# Altium PCB iR-Blaster.PcbDoc
Units mil, origin at the board's own origin, x right, y up, seen from the top; angles counter-clockwise.
Board outline 1958.66 x 1633.86 mil, 4 copper layers (Top Layer, GND, Power, Bottom Layer), stack 61.811 mil thick; 49 components, 31 nets, 174 pads, 59 vias.
Unrouted connection lines stored in the file: 2.
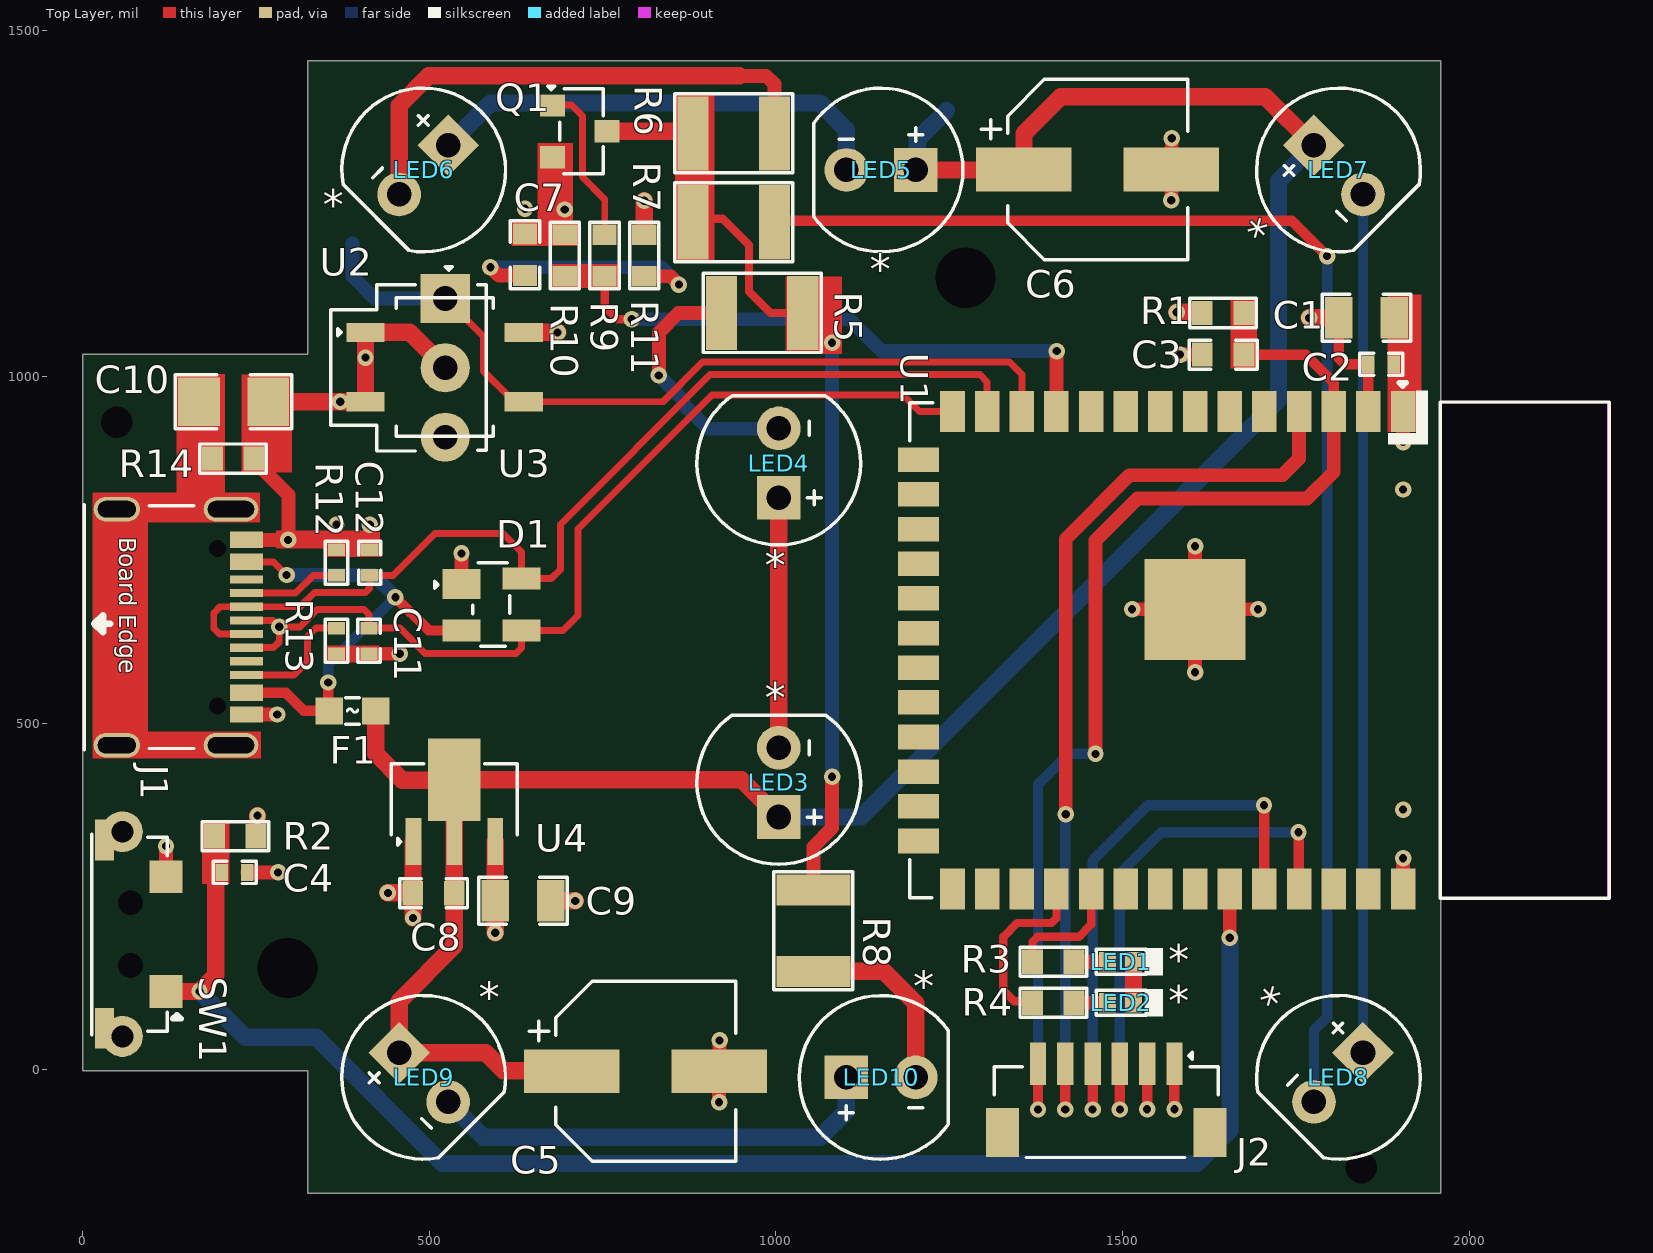
[diagram p0: Top Layer view]
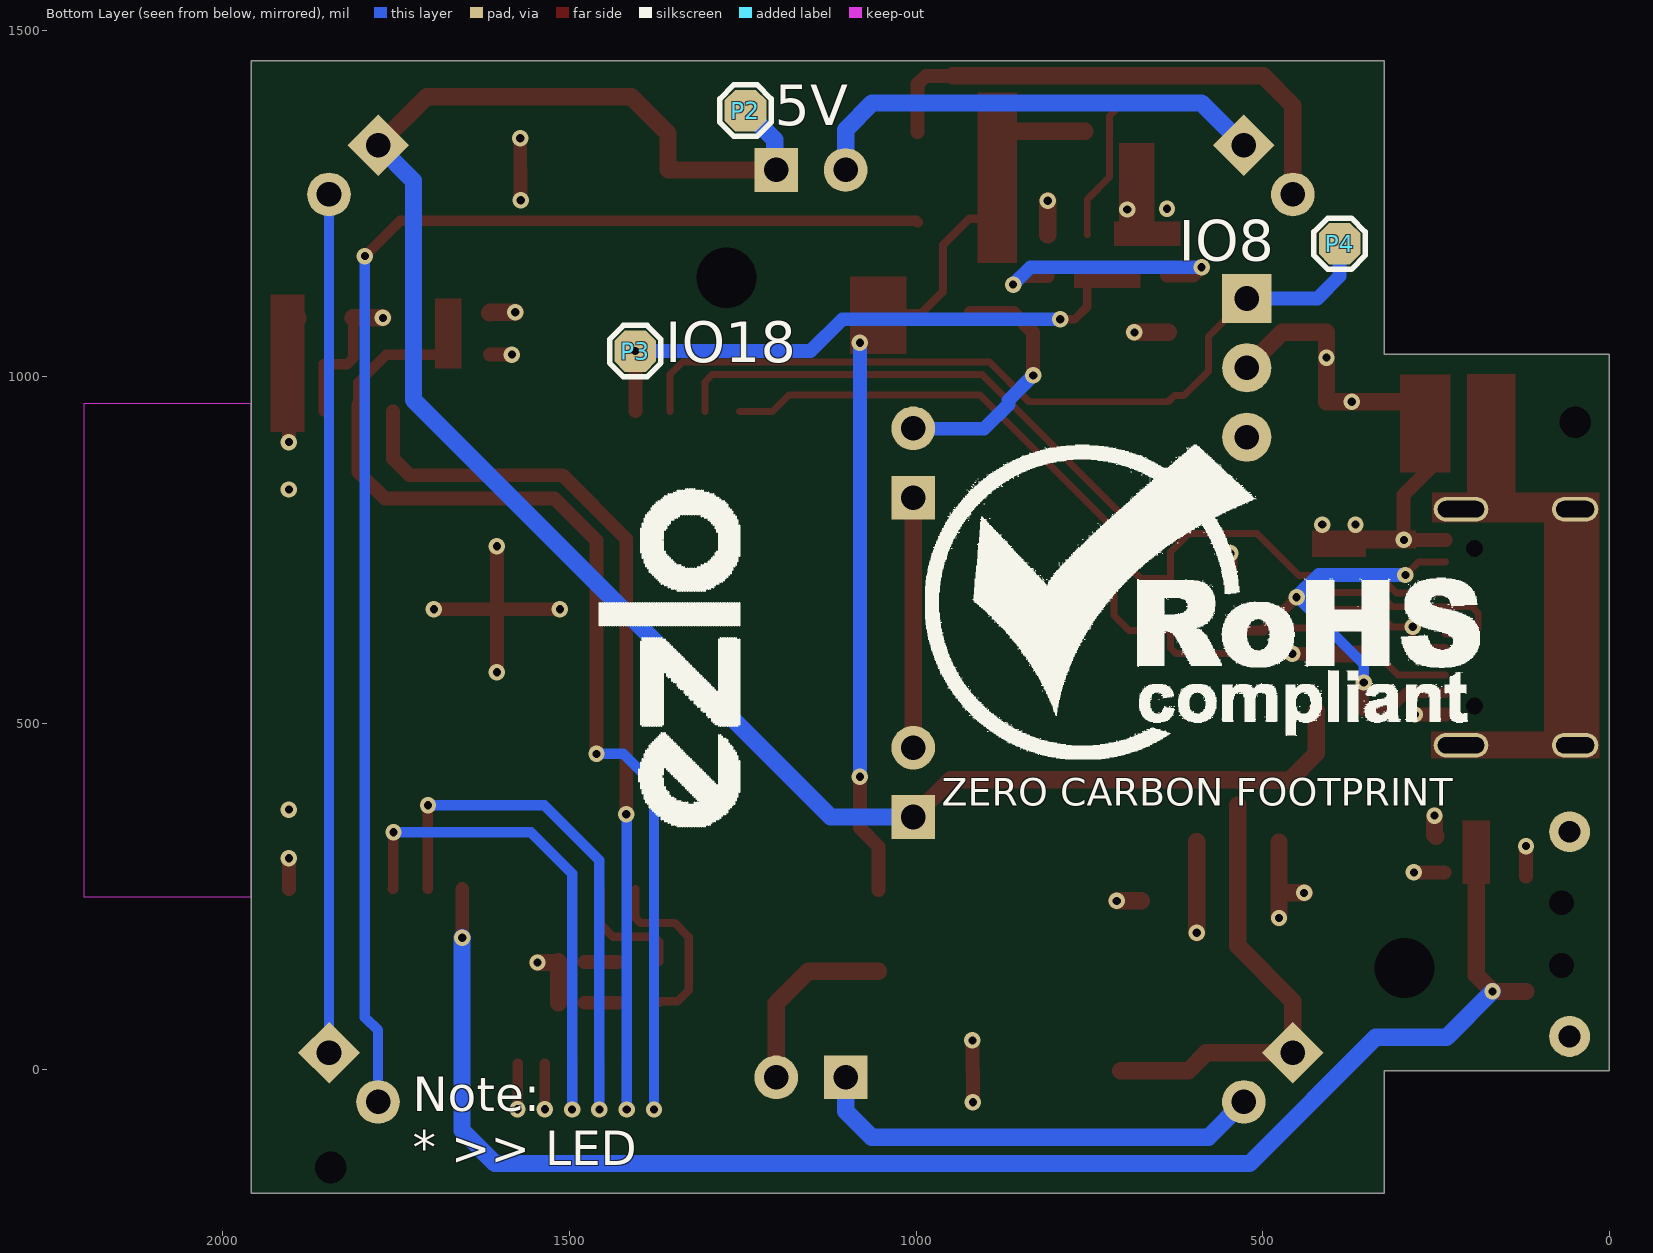
[diagram p1: Bottom Layer view, seen from below]
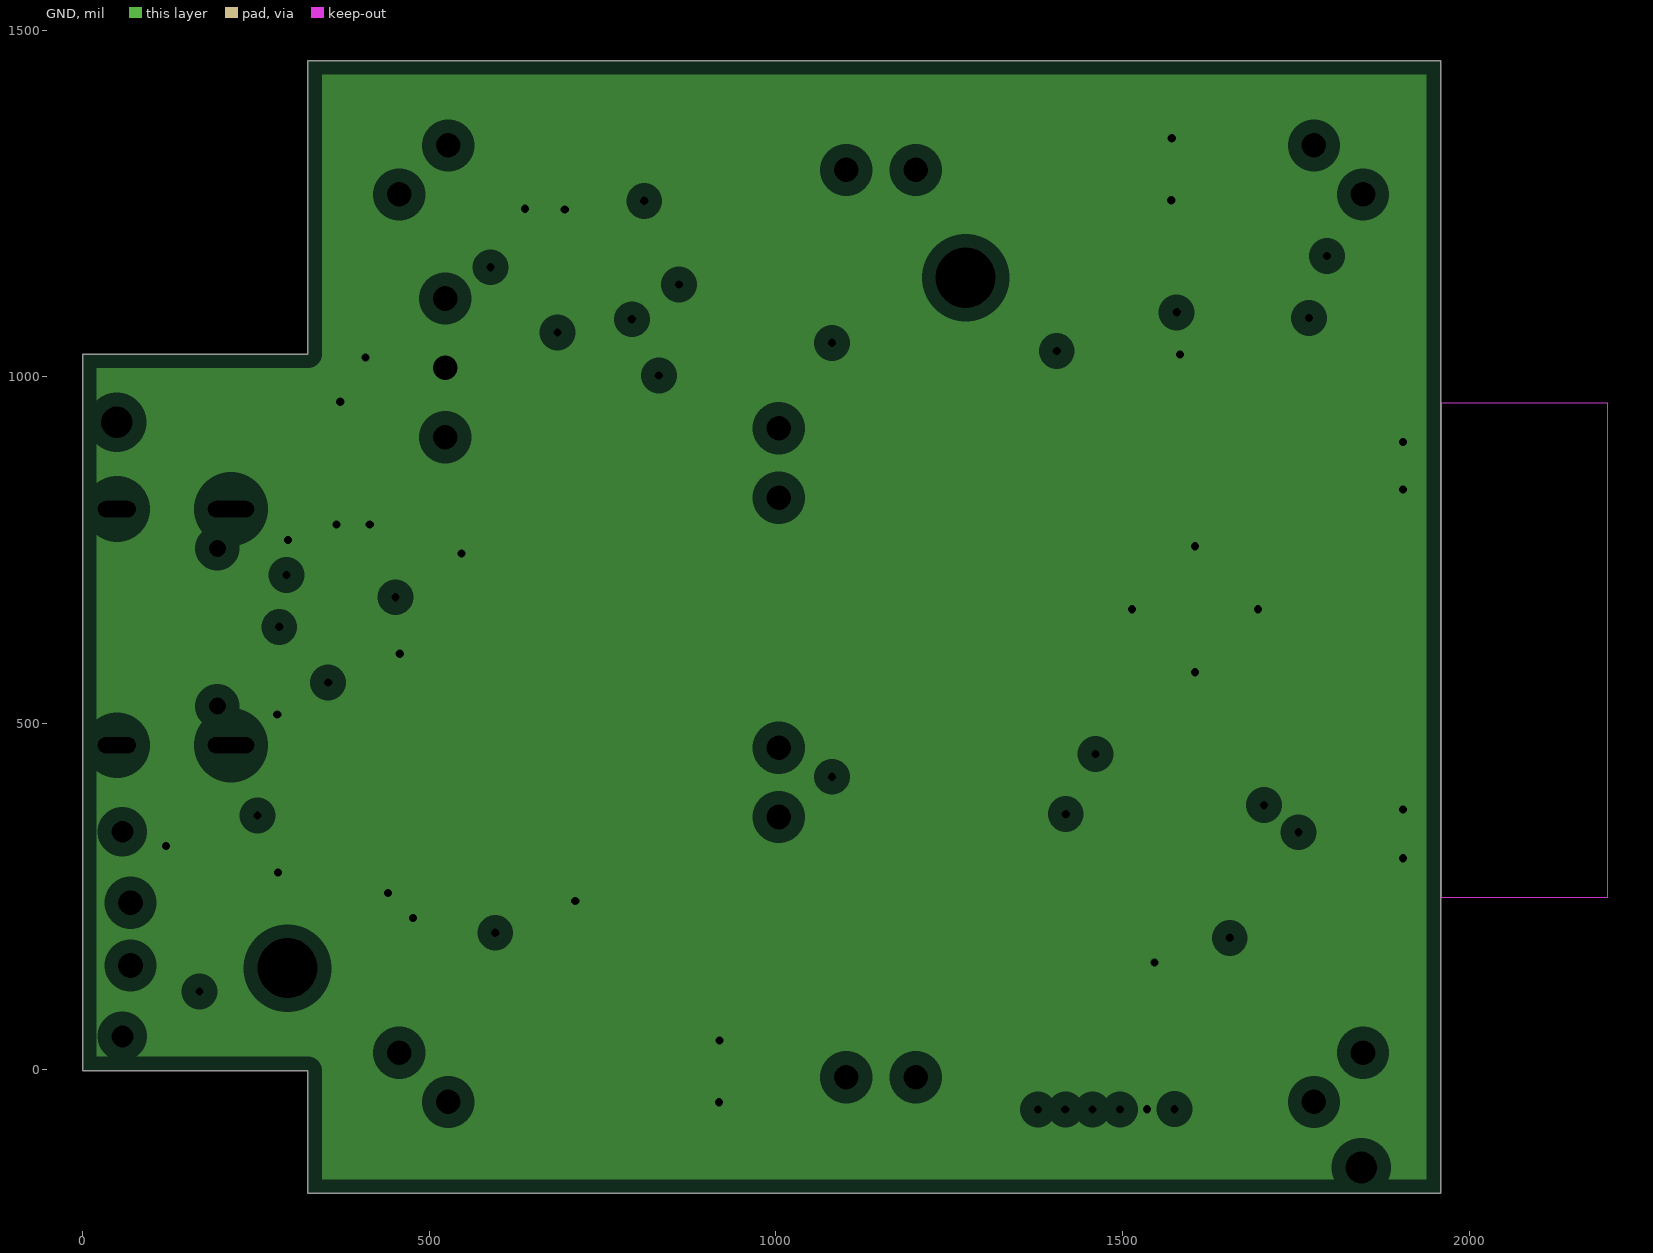
[diagram p2: GND, clearances drawn from the general rule]
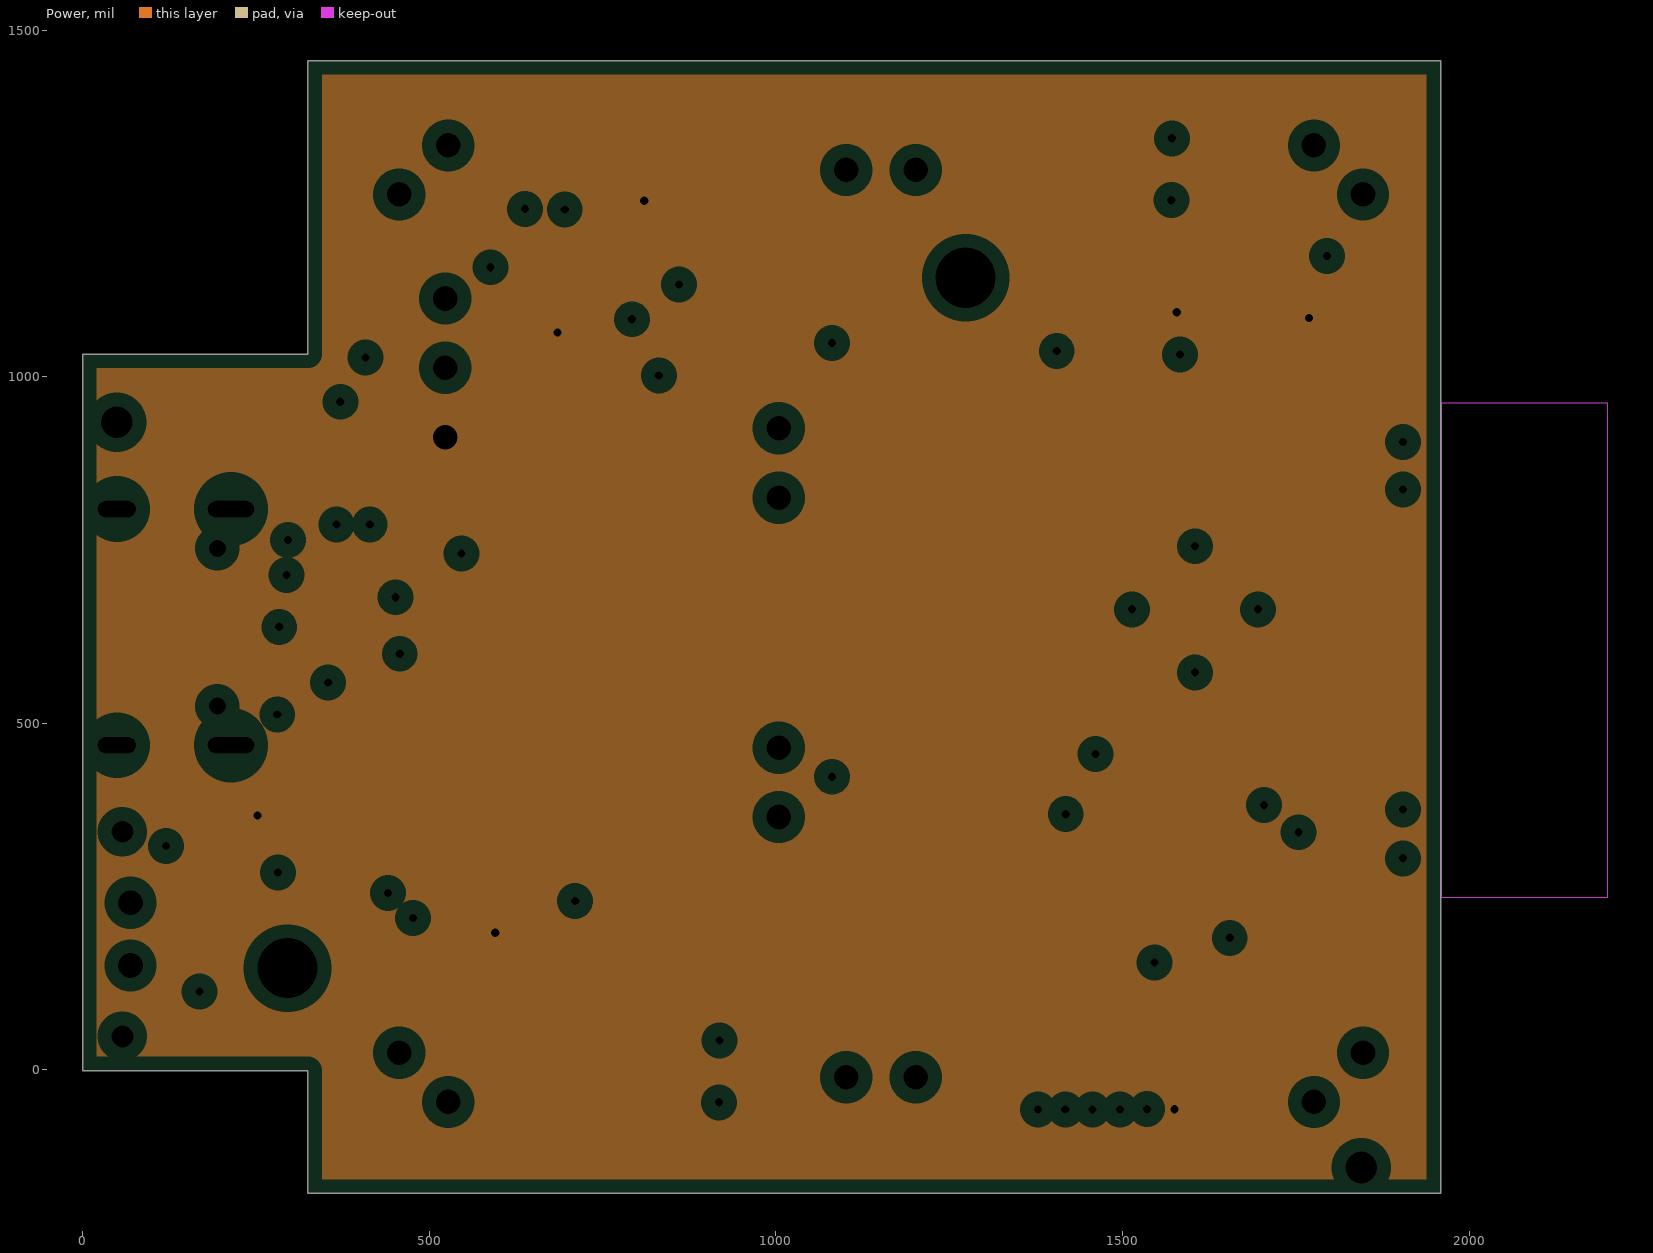
[diagram p3: Power, clearances drawn from the general rule]
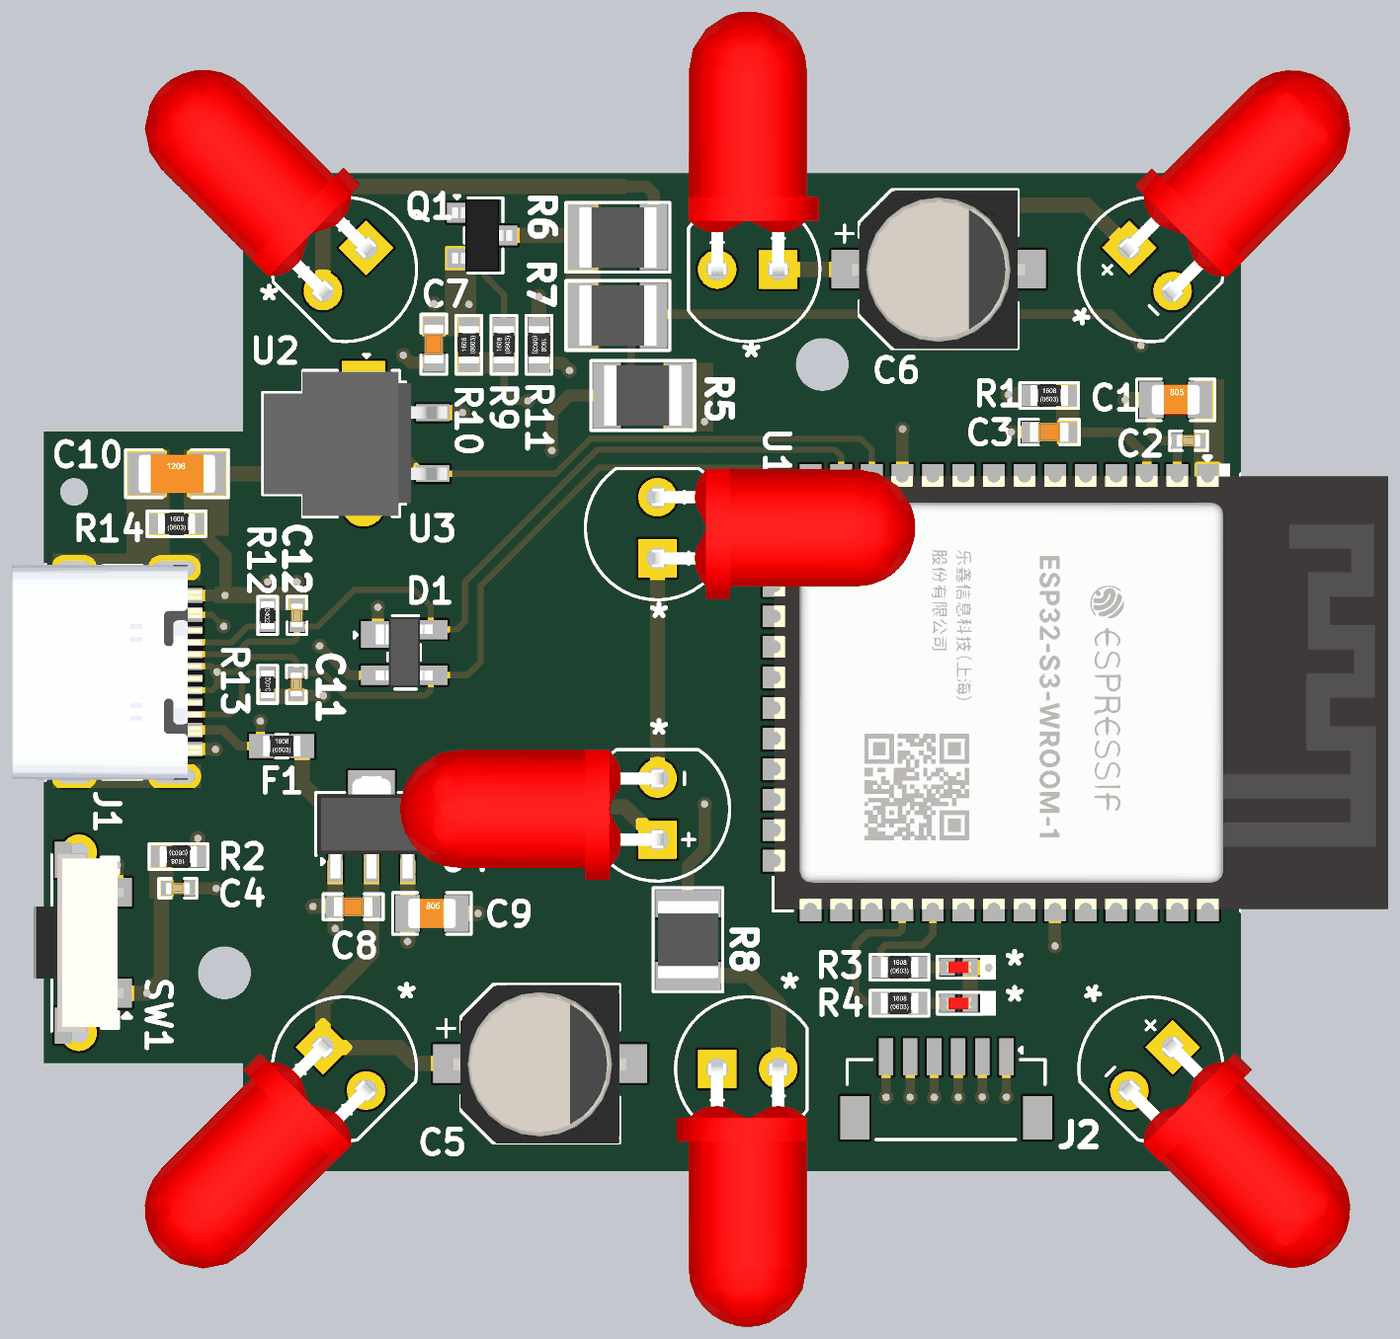
[diagram p4: 3D render of the assembled board from above, using the file's embedded part models]

## Layer stack, top to bottom
Top Solder: solder mask 0.4, Solder Resist, Dk 3.5
Top Layer: signal copper 1.378
Dielectric 2: prepreg 7.874, PP-006, Dk 4.1
GND: plane copper 1.378, net GND
Dielectric 1: core 40.5512, FR-4, Dk 4.8
Power: plane copper 1.378, net 3V3
Dielectric 3: prepreg 7.874, PP-006, Dk 4.1
Bottom Layer: signal copper 1.378
Bottom Solder: solder mask 0.4, Solder Resist, Dk 3.5

## Board outline
0,-0.83 324.8,-0.83 324.8,-178 1958.66,-178 1958.66,1455.86 324.8,1455.86 324.8,1032.63 0,1032.63

## Design rules (kind name [scope] priority, off if disabled: settings)
Clearance [All] p1: gap=6 ignorepadtopadclearanceinfootprint=FALSE
ComponentClearance [All] p1: gap=0 collisioncheckmode=3 verticalgap=0 showdistances=FALSE
HoleSize [All] p1: absolutevalues=TRUE maxlimit=1000 minlimit=1 maxpercent=80.000 minpercent=20.000
HoleToHoleClearance [All] p1: gap=0 allowstackedmicrovias=TRUE
MinimumSolderMaskSliver [All] p1: minsoldermaskwidth=0
PlaneClearance [All] p1: clearance=20
PlaneConnect [All] p1: planeconnectstyle=Relief reliefexpansion=20 reliefentries=4 reliefconductorwidth=10 reliefairgap=10
PolygonConnect [All] p1: connectstyle=Relief reliefconductorwidth=10 reliefentries=4 polygonreliefangle="90 Angle" airgapwidth=10
RoutingVias [All] p1: holewidth=11.81 width=23.62 viastyle="Through Hole" minholewidth=11.81 minwidth=23.62 maxholewidth=31.5 maxwidth=62.99
SilkToSilkClearance [All] p1: silktosilkclearance=0
SilkToSolderMaskClearance [IsPad] p1: minsilkscreentomaskgap=0 clearancetoexposedcopper=TRUE
SolderMaskExpansion [All] p1: expansion=4 istentingtop=FALSE
Width [All] p1: maxlimit=25 minlimit=10 preferedwidth=15
22 further rules are at their usual default settings.

## Classes and differential pairs
component class "USB & LDO_Section": C8 C9 C10 C11 C12 D1 F1 J1 R12 R13 R14 U4
component class iR_Receiver_Section: C7 P4 R11 U2 U3
component class iR-Blaster_Section: C5 C6 LED3 LED4 LED5 LED6 LED7 LED8 LED9 LED10 P2 P3 Q1 R5 R6 R7 R8 R9 R10
component class Controller_Section: C1 C2 C3 C4 J2 LED1 LED2 R1 R2 R3 R4 SW1 U1

## Components (designator, comment, footprint, x,y, rotation, side; value= is the part's Value field where it differs from the comment)
C1 "22uF" Cap-0805 1852,1085 r0 top
C2 "0.1uF" Cap-0402 1873,1018 r0 top
C3 "1uF" Cap-0603 1645,1032 r0 top
C4 "0.1uF" Cap-0402 219,285 r180 top
C5 "220uF" RT1A221M0605 812,-2 r0 top locked
C6 "220uF" RT1A221M0605 1464,1299 r0 top locked
C7 "4.7UF" Cap-0603 638,1176 r270 top
C8 "10uF" Cap-0603 506,255 r180 top
C9 "22uF" Cap-0805 635,244 r0 top
C10 "4.7nF" Cap-1206 217.66,963.86 r0 top
C11 "TBD" Cap-0402 413,619 r270 top
C12 "TBD" Cap-0402 414,732 r90 top
D1 "SP0503BAHTG" SOT-143-4_ 546.39,700.93 r0 top
F1 "BSMD0603L-100" fuse-0603 389,518 r0 top
J1 "TYPE-C-31-M-12" TYPE-C-31-M-12_ 236.22,764.72 r270 top locked
J2 "Voltlink Target" "Voltlink Target" 1476.38,-40.7 r180 top locked
LED1 "Green" LED-0402 1497,156 r0 top
LED2 "Red" LED-0402 1497,97 r0 top
LED3 "IR333-A" "IR333-A Cut" 1004,414.91 r270 top locked
LED4 "IR333-A" IR333_A 1004,875.54 r90 top locked
LED5 "IR333-A" IR333_A 1151.57,1298.38 r180 top locked
LED6 "IR333-A" IR333_A 491.73,1298.38 r225 top locked
LED7 "IR333-A" "IR333-A CUT" 1811.42,1298.38 r135 top
LED8 "IR333-A" "IR333-A CUT" 1811.42,-10.68 r45 top locked
LED9 "IR333-A" IR333_A 491.73,-10.68 r315 top locked
LED10 "IR333-A" IR333_A 1151.57,-10.68 r0 top locked
P2 "TEST POINT" Test-point 1246,1384 r180 bottom
P3 "TEST POINT" Test-point 1405,1037 r180 bottom
P4 "TEST POINT" Test-point 389,1192 r180 bottom
Q1 "YJL2302B" SOT-23-3L_ 717,1354 r270 top
R1 "10K" RES-0603 1645,1092 r180 top
R2 "10K" RES-0603 220,337 r0 top
R3 "330R" Res-0603 1400,156 r180 top
R4 "330R" Res-0603 1400,97 r180 top
R5 "27R" Res_1210 980,1092 r180 top
R6 "27R" Res_1210 939,1351 r0 top
R7 "27R" Res_1210 939,1223 r0 top
R8 "27R" Res_1210 1054,201 r270 top
R9 "100R" Res-0603 752.67,1175 r270 top
R10 "10K" RES-0603 695.33,1175 r270 top
R11 "100R" Res-0603 810,1175 r90 top
R12 "5.1K" Res-0402 366,732 r270 top
R13 "5.1K" Res-0402 366,619 r90 top
R14 "1M" Res-0603 217,882 r180 top
SW1 "YTS-B003-2A" YTS-B003-2A 75.79,196.02 r90 top locked
U1 "ESP32-S3-WROOM-1-N4" "41-SMD Module" 1555,605.51 r270 top locked
U2 "IRM-H638T/TR2" SMD-4,4x5mm 522,1014 r0 top locked
U3 "IRM-3638T" SIP-3P-2.54mm 522.83,1012.94 r270 top locked
U4 "LR1107G-33-AB3-C-R" SOT-89-3 536,374 r0 top

## Footprints (in the part's own frame and the unit in brackets; to place one, negate y for a bottom-side part, rotate by r counter-clockwise, add the part's x,y. Pads: shape width x height; smd on the part's side, far side on the other; paste and mask are expansions set on the pad)
"41-SMD Module" [mm]
  rect 1.5x0.9 smd: 1(-8.75,8.88) 2(-8.75,7.61) 3(-8.75,6.34) 4(-8.75,5.07) 5(-8.75,3.8) 6(-8.75,2.53) 7(-8.75,1.26) 8(-8.75,-0.01) 9(-8.75,-1.28) 10(-8.75,-2.55) 11(-8.75,-3.82) 12(-8.75,-5.09) 13(-8.75,-6.36) 14(-8.75,-7.63) 27(8.75,-7.63) 28(8.75,-6.36) 29(8.75,-5.09) 30(8.75,-3.82) 31(8.75,-2.55) 32(8.75,-1.28) 33(8.75,-0.01) 34(8.75,1.26) 35(8.75,2.53) 36(8.75,3.8) 37(8.75,5.07) 38(8.75,6.34) 39(8.75,7.61) 40(8.75,8.88)
  rect 0.9x1.5 smd: 15(-6.98,-8.88) 16(-5.71,-8.88) 17(-4.44,-8.88) 18(-3.17,-8.88) 19(-1.9,-8.88) 20(-0.63,-8.88) 21(0.64,-8.88) 22(1.91,-8.88) 23(3.18,-8.88) 24(4.45,-8.88) 25(5.72,-8.88) 26(6.99,-8.88)
  rect 3.7x3.7 smd: 41(-1.5,1.26)
  Keep-Out Layer region: -9.042,10.285 9.042,10.285 9.042,16.381 -9.042,16.381
  silkscreen extent -9.8,-9.2 9.09,16.43, body extent -9.01,-9.14 9.01,16.37, height 3.16
Cap-0402 [mil]
  rect 18x25 smd mask+2.36: 1(-18.5,0) 2(18.5,0)
  silkscreen extent -31,-16 31,16, body extent -20,-10 20,10, height 19
Cap-0603 [mil]
  rect 30x35 smd mask+2.36: 1(-30,0) 2(30,0)
  silkscreen extent -49,-21 49,21, body extent -32,-16 31,16, height 34
Cap-0805 [mil] "SMD 0805"
  rect 40x60 smd mask+2.76: 1(-40,0) 2(40,0)
  silkscreen extent -64,-34 64,34, body extent -39,-25 39,25, height 30
Cap-1206 [mil] "SMD 1206"
  rect 60x70 smd: 1(-50,0) 2(50,0)
  silkscreen extent -84,-39 84,39, body extent -63,-31 63,32, height 39
fuse-0603 [mm]
  rect 1x1 smd: 1(-0.85,0) 2(0.85,0)
  silkscreen extent -0.25,-0.48 0.25,0.48, body extent -0.77,-0.42 0.78,0.43, height 0.45
"IR333-A Cut" [mm]
  rect 1.6x1.6 hole 0.9: 1(1.27,0)
  round 1.6 hole 0.9: 2(-1.27,0)
  silkscreen extent -2.47,-3 3,3, body extent -2.45,-10.7 2.95,0.25, height 7.95
"IR333-A CUT" [mm]
  rect 1.6x1.6 hole 0.9: 1(1.27,0)
  round 1.6 hole 0.9: 2(-1.27,0)
  silkscreen extent -2.47,-3 3,3, body extent -2.45,-10.7 2.95,0.25, height 7.95
IR333_A [mm]
  rect 1.6x1.6 hole 0.9: 1(-1.27,0)
  round 1.6 hole 0.9: 2(1.27,0)
  silkscreen extent -3,-3 2.47,3, body extent -2.95,-10.72 2.45,0.23, height 7.95
LED-0402 [mm]
  rect 0.62x0.72 smd: 1(-0.475,0) 2(0.475,0)
  silkscreen extent -0.89,-0.51 1.55,0.51, body extent -0.5,-0.25 0.51,0.25, height 0.45
Res-0402 [mil]
  rect 18x25 smd mask+2.17: 1(-18.5,0) 2(18.5,0)
  silkscreen extent -32,-17 32,16, body extent -23,-11 23,11, height 16
RES-0603 [mil]
  rect 30x35 smd: 1(-30,0) 2(30,0)
  silkscreen extent -48,-21 48,21, body extent -31,-17 31,17, height 18
Res-0603 [mil]
  rect 30x35 smd: 1(-30,0) 2(30,0)
  silkscreen extent -48,-21 48,21, body extent -31,-17 31,17, height 18
Res_1210 [mm]
  rect 1.14x2.72 smd: 1(-1.49,0) 2(1.49,0)
  silkscreen extent -2.16,-1.45 2.16,1.45, body extent -1.6,-1.25 1.6,1.25, height 0.7
RT1A221M0605 [mm]
  rect 3.5x1.6 smd: 1(-2.7,0) 2(2.7,0)
  silkscreen extent -4.27,-3.3 3.3,3.3, body extent -3.61,-3.33 3.59,3.27, height 5.4
SIP-3P-2.54mm [mm]
  rect 1.8x1.8 hole 0.9: 1(-2.54,0)
  round 1.8 hole 0.9: 2(0,0) 3(2.54,0)
  silkscreen extent -3.71,-4.19 3.05,1.5, body extent -3,-4.14 3,1.46, height 8.35
SMD-4,4x5mm [mm]
  rect 1.4x0.7 smd: 1(-2.9,1.27) 2(-2.9,-1.27) 3(2.9,-1.27) 4(2.9,1.27)
  silkscreen extent -3.91,-2.54 1.78,2.54, body extent -3.5,-2.5 3.5,2.5, height 3.99
SOT-23-3L_ [mm]
  rect 0.82x0.92 smd: 1(-0.95,-1) 2(0.95,-1) 3(0,1)
  silkscreen extent -1.65,-1.17 1.56,0.86, body extent -1.5,-1.25 1.5,1.25, height 1.1
SOT-89-3 [mm]
  rect 0.58x1.73 smd: 1(-1.5,-1.132) 2(0,-1.132) 3(1.5,-1.132)
  rect 1.933x3.03 smd: 2(0,1.132)
  silkscreen extent -2.31,-1.27 2.31,1.73, body extent -2.25,-1.84 2.25,2.41, height 1.54
SOT-143-4_ [mm]
  rect 1.4x1.1 smd: 1(0,0)
  rect 1.4x0.8 smd: 2(0,-1.7) 3(2.2,-1.7) 4(2.2,0.2)
  silkscreen extent -0.99,-2.27 1.76,0.77, body extent -0.08,-2.21 2.29,0.71, height 1.22
Test-point [mil]
  oct 60x60 smd: 1(0,0)
  silkscreen extent -37,-37 37,37
TYPE-C-31-M-12_ [mm]
  rect 0.6x1.2 smd: A1/B12(0,0) A4/B9(0.8,0) B1/A12(6.4,0) B4/A9(5.6,0)
  rect 0.3x1.2 smd: A5(1.95,0) A6(2.95,0) A7(3.45,0) A8(4.45,0) B5(4.95,0) B6(3.95,0) B7(2.45,0) B8(1.45,0)
  round 0 hole 0.62 unplated: MH(0.31,-1.07) MH(6.09,-1.07)
  oval 0.9x2 hole 0.6 slot 1.7 at 90 deg: S1(7.525,-0.57) S4(-1.125,-0.57)
  oval 0.9x1.7 hole 0.6 slot 1.4 at 90 deg: S2(7.525,-4.75) S3(-1.125,-4.75)
  silkscreen extent -1.3,-5.94 7.7,-1.93, body extent -1.27,-7.32 7.67,0.58, height 3.31
"Voltlink Target" [mm]
  rect 0.6x1.55 smd: 1(-2.5,-1.262) 2(-1.5,-1.262) 3(-0.5,-1.262) 4(0.5,-1.262) 5(1.5,-1.262) 6(2.5,-1.262)
  rect 1.2x1.8 smd: MP1(-3.8,1.262) MP2(3.8,1.262)
  silkscreen extent -4.11,-1.68 4.11,2.17
YTS-B003-2A [mm]
  rect 1.2x1.2 smd: 1(-2.1,-1.125) 2(2.1,-1.125)
  rect 1.5x0.7 smd: 3(3.45,1.125) 4(-3.45,1.125)
  round 1.5 hole 0.8: 5(3.75,0.475) 6(-3.75,0.475)
  round 0 hole 0.9 unplated: MH0(-1.15,0.175) MH1(1.15,0.175)
  silkscreen extent -3.68,-1.68 3.66,1.6, body extent -3.7,-1.37 3.7,2.36, height 3.59

## Part data
C1 C9: library part CL21A226MAYNNNE, "CAP CER 22UF 25V X5R 0805", LCSC Part Number=C602037, Manufacturer=Samsung, Supplier Part Number 1=187-CL21A226MAYNNNE, Category="Ceramic Capacitors", Manufacturer Part Number=CL21A226MAYNNNE, Pricing 1="1=0.28000, 10=0.18500, 50=0.18500, 100=0.10600, 500=0.07500, 1000=0.06400, 2000=0.06100, 10000=0.05400, 24000=0.05100, 50000=0.04600 (USD)", RoHS=Yes, RoHS Compliant=Yes, Stock 1=1240410, Supplier 1=Mouser
C2 C4: library part C1005X5R1H104K050BB, "CAP CER 0.1UF 50V X5R 0402", Capacitance=100nF, Case Code (Imperial)=0402, Case Code (Metric)=1005, Dielectric=X5R, Dielectric Material=Ceramic, LCSC Part Number=C2181865, Manufacturer=TDK, Max Operating Temperature=85°C, Min Operating Temperature=-55°C, Package Quantity=1, Supplier Part Number 1=445-5942-1-ND, Tolerance=10%, Voltage=50V, Case/Package=0402, ComponentLink1Description=https://product.tdk.com/info/en/catalog/spec/mlccspec_commercial_general_midvoltage_en.pdf?src-supplier=Digi-Key, ComponentLink1URL=https://product.tdk.com/info/en/catalog/spec/mlccspec_commercial_general_midvoltage_en.pdf?src-supplier=Digi-Key, ComponentLink2Description=http://www.tdk.co.jp/tefe02/e413_c.pdf?src-supplier=Future+Electronics, ComponentLink2URL=http://www.tdk.co.jp/tefe02/e413_c.pdf?src-supplier=Future+Electronics, ComponentLink3Description=https://www.verical.com/server-webapp/html/getDatasheet?partID=743571&src-supplier=Verical, ComponentLink3URL=https://www.verical.com/server-webapp/html/getDatasheet?partID=743571&src-supplier=Verical, ComponentLink4Description=http://www.tdk.co.jp/tefe02/e412_c.pdf?src-supplier=Avnet+Europe, ComponentLink4URL=http://www.tdk.co.jp/tefe02/e412_c.pdf?src-supplier=Avnet+Europe, Construction=Flat, Depth=0.5mm, Height=0.5mm, Lead Free="Lead Free", Length=1mm, Manufacturer Part Number=C1005X5R1H104K050BB, Mount="Surface Mount", Packaging="Tape and Reel", Pricing 1="1=0.12, 10=0.09, 50=0.049, 100=0.04, 500=0.02858, 1000=0.02245, 2500=0.02041, 5000=0.01878 (USD)", Radiation Hardening=No, REACH SVHC="No SVHC", Resistor Type=Ceramic, RoHS Compliant=Yes, Series=C, Stock 1=1455182, Supplier 1=Digi-Key, Termination=SMD/SMT, Thickness=0.022inch, Voltage Rating=50V, Voltage Rating (DC)=50V, Weight=2.3E-05oz, Width=0.02inch
C3: library part CC0603KRX5R8BB105, "CAP CER 1UF 25V X5R 0603", Case Code (Imperial)=0603, Case Code (Metric)=1608, Dielectric=X5R, LCSC Part Number=C14664, Manufacturer=Yageo, Max Operating Temperature=85°C, Min Operating Temperature=-55°C, Package Quantity=1, Supplier Part Number 1=311-1445-1-ND, Tolerance=10%, Voltage Rating=25V, Capacitance=1uF, Case/Package=0603, Category="Ceramic Capacitors", ComponentLink1Description=https://datasheet.ciiva.com/176/mlccorderingcode-176785.pdf?src-supplier=Digi-Key, ComponentLink1URL=https://datasheet.ciiva.com/176/mlccorderingcode-176785.pdf?src-supplier=Digi-Key, ComponentLink2Description=https://datasheet.ciiva.com/176/mlccorderingcode-176786.pdf?src-supplier=Digi-Key, ComponentLink2URL=https://datasheet.ciiva.com/176/mlccorderingcode-176786.pdf?src-supplier=Digi-Key, ComponentLink3Description=https://datasheet.ciiva.com/176/mlccorderingcode-176787.pdf?src-supplier=Digi-Key, ComponentLink3URL=https://datasheet.ciiva.com/176/mlccorderingcode-176787.pdf?src-supplier=Digi-Key, ComponentLink4Description=https://datasheet.ciiva.com/17436/upy-gphc-x5r-4v-to-50v-12-17436952.pdf?src-supplier=Avnet+Europe, ComponentLink4URL=https://datasheet.ciiva.com/17436/upy-gphc-x5r-4v-to-50v-12-17436952.pdf?src-supplier=Avnet+Europe, ComponentLink5Description=https://datasheet.ciiva.com/7978/1525783-7978171.pdf?src-supplier=Element14, ComponentLink5URL=https://datasheet.ciiva.com/7978/1525783-7978171.pdf?src-supplier=Element14, ComponentLink6Description=https://datasheet.ciiva.com/11586/upy-gphc-x5r-4v-to-50v-12-11586318.pdf?src-supplier=Avnet, ComponentLink6URL=https://datasheet.ciiva.com/11586/upy-gphc-x5r-4v-to-50v-12-11586318.pdf?src-supplier=Avnet, Construction=Flat, Depth=0.8mm, Halogen Free="Halogen Free", Height=0.8mm, Lead Free="Lead Free", Length=1.6mm, Manufacturer Part Number=CC0603KRX5R8BB105, Mount="Surface Mount", Number of Pins=2, Packaging="Tape and Reel", Pricing 1="1=0.12000, 10=0.08400, 50=0.04760, 100=0.03940, 500=0.02764, 1000=0.02288 (USD)", Radiation Hardening=No, REACH SVHC="No SVHC", RoHS=Yes, RoHS Compliant=Yes, Series=CC, Stock 1=919939, Supplier 1=Digi-Key, Termination=SMD/SMT, Thickness=0.035inch, Voltage Rating (DC)=25V, Width=0.031inch
C5 C6: library part RT1A221M0605, "220uF 5.4mm 10V 6.3mm ±20% SMD,D6.3xL5.4mm Aluminum Electrolytic Capacitors - SMD ROHS", LCSC Part Number=C267466, Manufacturer=ROQANG, Package=SMD,D6.3xL5.4mm, ComponentLink1Description=LCSC, ComponentLink1URL=https://lcsc.com/product-detail/Aluminum-Electrolytic-Capacitors-SMD_ROQANG-RT1A221M0605_C267466.html, Item Type=Capacitor, Manufacturer Part Number=RT1A221M0605
C7: library part CL10A475KA8NQNC, "CAP CER 4.7UF 25V X5R 0603", Capacitance=4.7uF, Case Code (Imperial)=0603, Case Code (Metric)=1608, Dielectric=X5R, LCSC Part Number=C69335, Manufacturer=Samsung, Max Operating Temperature=85°C, Min Operating Temperature=-55°C, Package Quantity=1, Supplier Part Number 1=1276-1900-1-ND, Tolerance=10%, Voltage Rating=25V, Case/Package=0603, ComponentLink1Description=http://www.samsungsem.com/kr/support/product-search/mlcc/CL10A475KA8NQNC.jsp?src-supplier=Digi-Key, ComponentLink1URL=http://www.samsungsem.com/kr/support/product-search/mlcc/CL10A475KA8NQNC.jsp?src-supplier=Digi-Key, Contact Plating=Tin, Depth=0.8mm, Lead Free="Lead Free", Length=1.6mm, Manufacturer Part Number=CL10A475KA8NQNC, Mount="Surface Mount", Packaging="Tape and Reel", Pricing 1="1=0.37, 10=0.255, 100=0.1528, 500=0.11456, 1000=0.09675 (USD)", Stock 1=2252340, Supplier 1=Digi-Key, Termination=Wraparound, Thickness=0.035inch, Width=0.031inch
C8: library part C1608X5R1E106M080AC, "CAP CER 10UF 25V X5R 0603", Case Code (Imperial)=0603, Case Code (Metric)=1608, Dielectric=X5R, Dielectric Material=Ceramic, LCSC Part Number=C2168289, Manufacturer=TDK, Max Operating Temperature=85°C, Min Operating Temperature=-55°C, Package Quantity=1, Supplier Part Number 1=445-9015-1-ND, Tolerance=20%, Voltage Rating=25V, Capacitance=10uF, Case/Package=0603, Composition=Ceramic, Depth=0.8mm, Height=0.8mm, Lead Free="Lead Free", Length=1.6mm, Manufacturer Part Number=C1608X5R1E106M080AC, Mount="Surface Mount", Packaging="Tape and Reel", Pricing 1="1=0.96, 10=0.704, 100=0.483, 500=0.38238, 1000=0.322 (USD)", REACH SVHC="No SVHC", Stock 1=61681, Supplier 1=Digi-Key, Termination=SMD/SMT, Thickness=0.039inch, Voltage Rating (DC)=25V, Weight=7.1E-05oz, Width=0.8mm
C10: library part CC1206KKX7RCBB472, "CAP CER 4700PF 1KV X7R 1206", Case Code (Imperial)=1206, Case Code (Metric)=3216, Dielectric=X7R, Dielectric Material=Ceramic, LCSC Part Number=C107198, Manufacturer=Yageo, Max Operating Temperature=125°C, Min Operating Temperature=-55°C, Supplier Part Number 1=7130131, Tolerance=10%, Voltage Rating=1kV, Capacitance=4.7nF, Case/Package=1206, Category="Ceramic Capacitors", ComponentLink1Description=https://datasheet.ciiva.com/13208/upy-gp-np0-16v-to-50v-8-13208693.pdf?src-supplier=Mouser, ComponentLink1URL=https://datasheet.ciiva.com/13208/upy-gp-np0-16v-to-50v-8-13208693.pdf?src-supplier=Mouser, ComponentLink2Description=https://datasheet.ciiva.com/11466/hv-11466701.pdf?src-supplier=Avnet, ComponentLink2URL=https://datasheet.ciiva.com/11466/hv-11466701.pdf?src-supplier=Avnet, Depth=1.6mm, Item Type=Capacitor, Lead Free="Lead Free", Length=3.2mm, Manufacturer Part Number=CC1206KKX7RCBB472, Mount="Surface Mount", Number of Pins=2, Packaging="Tape and Reel", Pricing 1="3000=0.02860, 9000=0.02750, 15000=0.02700, 45000=0.02600, 75000=0.02510 (USD)", Radiation Hardening=No, Resistor Type=Ceramic, RoHS=Yes, RoHS Compliant=Yes, Series=CC, Stock 1=180000, Supplier 1="Future Electronics", Termination=SMD/SMT, Thickness=0.057inch, Voltage Rating (DC)=1kV, Weight=0.000571oz, Width=0.063inch
C11 C12: library part "Capacitor 0402", "DO Not Mount"
D1: "ESD Suppressor TVS 5.5V 4-Pin(3+Tab) SOT-143 T/R", Breakdown Voltage=5.5V, Capacitance=30pF, Case/Package=SOT-143, Clamping Voltage=7.8V, Clamping Voltage-Max=8V, LCSC Part Number=C3029025, Leakage Current=100nA, Manufacturer=Littelfuse, Max Operating Temperature=85°C, Max Power Dissipation=225mW, Min Operating Temperature=-40°C, Power Line Protection=No, Resistor Type=Zener, Supplier Part Number 1=F2715CT-ND, Voltage Rating (DC)=5V, Category=Diodes, ComponentLink1Description=https://datasheet.ciiva.com/15143/getdatasheetpartid-116020-15143550.pdf?src-supplier=Verical, ComponentLink1URL=https://datasheet.ciiva.com/15143/getdatasheetpartid-116020-15143550.pdf?src-supplier=Verical, ComponentLink2Description=https://datasheet.ciiva.com/332/sp05xxba-332550.pdf?src-supplier=Digi-Key, ComponentLink2URL=https://datasheet.ciiva.com/332/sp05xxba-332550.pdf?src-supplier=Digi-Key, ComponentLink3Description=https://datasheet.ciiva.com/8062/littefuse-spa-sp050x-8062422.pdf?src-supplier=Element14, ComponentLink3URL=https://datasheet.ciiva.com/8062/littefuse-spa-sp050x-8062422.pdf?src-supplier=Element14, ComponentLink4Description=https://datasheet.ciiva.com/22697/1911798-22697942.pdf?src-supplier=Element14, ComponentLink4URL=https://datasheet.ciiva.com/22697/1911798-22697942.pdf?src-supplier=Element14, ComponentLink5Description=https://datasheet.ciiva.com/332/sp05xxba-332551.pdf?src-supplier=Digi-Key, ComponentLink5URL=https://datasheet.ciiva.com/332/sp05xxba-332551.pdf?src-supplier=Digi-Key, ComponentLink6Description=https://datasheet.ciiva.com/16449/sp05xxba-16449463.pdf?src-supplier=Future+Electronics, ComponentLink6URL=https://datasheet.ciiva.com/16449/sp05xxba-16449463.pdf?src-supplier=Future+Electronics, ComponentLink7Description=https://datasheet.ciiva.com/332/sp05xxba-332552.pdf?src-supplier=Digi-Key, ComponentLink7URL=https://datasheet.ciiva.com/332/sp05xxba-332552.pdf?src-supplier=Digi-Key, ComponentLink8Description=https://datasheet.ciiva.com/4509/sp05x-leadfree-4509162.pdf?src-supplier=Mouser, ComponentLink8URL=https://datasheet.ciiva.com/4509/sp05x-leadfree-4509162.pdf?src-supplier=Mouser, ComponentLink9Description=https://datasheet.ciiva.com/7650/526672-7650894.pdf?src-supplier=Element14, ComponentLink9URL=https://datasheet.ciiva.com/7650/526672-7650894.pdf?src-supplier=Element14, Depth=1.4mm, Diode Type=Avalanche, Direction=Unidirectional, Element Configuration="Common Anode", ESD Protection=Yes, Height=1.05mm, Lead Free="Lead Free", Length=3.04mm, Manufacturer Part Number=SP0503BAHTG, Max Reverse Leakage Current=100nA, Mount="Surface Mount", Number of Channels=3, Number of Elements=3, Number of Pins=4, Number of Unidirectional Channels=3, Operating Supply Voltage=5.5V, Packaging="Tape and Reel", Peak Pulse Power=225mW, Polarity=Bidirectional,Unidirectional, Power Dissipation=225mW, Pricing 1="1=0.92000, 10=0.81200, 100=0.62260, 500=0.49214, 1000=0.39371 (USD)", Radiation Hardening=No, REACH SVHC="No SVHC", Reverse Standoff Voltage=5.5V, RoHS=Yes, RoHS Compliant=Yes, Series="SP05, SPA®", Stock 1=651, Supplier 1=Digi-Key, Termination=SMD/SMT, Width=1.4mm, Working Voltage=5.5V
F1: "6V 1A 50A 1W -40℃~+85℃ 2A 9mΩ 0.5s 80mΩ 0603 Resettable Fuses ROHS", LCSC Part Number=C2757929, Manufacturer=BHFUSE, Package=0603, ComponentLink1Description=LCSC, ComponentLink1URL=https://lcsc.com/product-detail/Resettable-Fuses_BHFUSE-BSMD0603L-100_C2757929.html, Item Type=Fuse, Manufacturer Part Number=BSMD0603L-100
J1: "250mA 1 16 Female Type-C SMD USB Connectors ROHS", LCSC Part Number=C165948, Manufacturer="Korean Hroparts Elec", ComponentLink1Description=LCSC, ComponentLink1URL=https://www.lcsc.com/product-detail/USB-Connectors_Korean-Hroparts-Elec-TYPE-C-31-M-12_C165948.html, Manufacturer Part Number=TYPE-C-31-M-12
J2: "DNP"
LED1: library part 16-213/GHC-YR1S1/3T, "Green 520~535nm 0402 Light Emitting Diodes (LED) RoHS", LCSC Part Number=C74338, Manufacturer="Everlight Elec", Package=0402, ComponentLink1Description=LCSC, ComponentLink1URL=https://www.lcsc.com/product-detail/Light-Emitting-Diodes-LED_Everlight-Elec-16-213-GHC-YR1S1-3T_C74338.html, Dominant Wavelength / Coordinate rank=520~535nm, Illumination Color=Green, Item Type=LED, Luminous Intensity (IF=20mA)=112~285mcd, Manufacturer Part Number=16-213/GHC-YR1S1/3T, Mounting Type="Surface Mount"
LED2: library part XZMDK68W-2, "LED RED CLEAR CHIP SMD", Case Code (Imperial)=0402, Case Code (Metric)=1005, Forward Voltage=1.95V, Lens Color=Colorless, Manufacturer=SunLED, Supplier Part Number 1=1497-1174-6-ND, Test Current=20mA, Case/Package=0402, Color=Red, ComponentLink1Description=http://www.sunledusa.com/products/spec/XZMDK68W-2.pdf?src-supplier=Digi-Key, ComponentLink1URL=http://www.sunledusa.com/products/spec/XZMDK68W-2.pdf?src-supplier=Digi-Key, ComponentLink2Description=https://www.sunledusa.com/products/spec/XZMDK68W-2.pdf?src-supplier=Digi-Key, ComponentLink2URL=https://www.sunledusa.com/products/spec/XZMDK68W-2.pdf?src-supplier=Digi-Key, Dominant Wavelength=630nm, Height=0.6mm, Item Type=LED, Length=1mm, Lens Transparency=Clear, Luminous Intensity=69mcd, Manufacturer Part Number=XZMDK68W-2, Mount="Surface Mount", Packaging="Tape and Reel", Pricing 1="1=0.43, 10=0.306, 100=0.136, 500=0.0952, 1000=0.0782 (USD)", Stock 1=69539, Supplier 1=Digi-Key, Viewing Angle=120°, Width=0.5mm
LED3 LED4 LED5 LED6 LED7 LED8 LED9 LED10: "EMITTER IR 940NM 100MA RADIAL", Case/Package=Radial, Forward Current=50mA, Forward Voltage=1.2V, LCSC Part Number=C95407, Manufacturer=Everlight, Max Operating Temperature=85°C, Max Power Dissipation=100mW, Min Operating Temperature=-40°C, Package Quantity=500, Reverse Voltage=5V, Supplier Part Number 1=1080-1080-ND, Test Current=20mA, Category=LEDs, ComponentLink1Description=https://datasheet.ciiva.com/2107/201407061516067600-2107736.pdf?src-supplier=Digi-Key, ComponentLink1URL=https://datasheet.ciiva.com/2107/201407061516067600-2107736.pdf?src-supplier=Digi-Key, ComponentLink2Description=https://datasheet.ciiva.com/48438/ir333-a-eng-tds-48438869.pdf?src-supplier=Distrelec, ComponentLink2URL=https://datasheet.ciiva.com/48438/ir333-a-eng-tds-48438869.pdf?src-supplier=Distrelec, Depth=5.9mm, Item Type="Infrared LED", Lead Free="Lead Free", Length=5.9mm, Lens Style=Diffused,Colored,Circular, Manufacturer Part Number=IR333-A, Mount="Through Hole", Number of Elements=1, Number of LEDs=1, Number of Pins=2, Orientation="Top View", Packaging=Bulk, Power Dissipation=100mW, Pricing 1="1=0.54000, 10=0.33000, 100=0.18950, 1000=0.14832, 2000=0.13596, 5000=0.12360, 10000=0.11536, 25000=0.11124 (USD)", RoHS=Yes, RoHS Compliant=Yes, Series=-, Stock 1=73854, Supplier 1=Digi-Key, Viewing Angle=20°, Wavelength=940nm
P2 P3 P4: "Test Point ON"
Q1: "20V 3A 40mΩ@4.5V,3A 700mW 780mV@250uA 29pF@10V N Channel 280pF@10V 2.9nC@4.5V -55℃~+150℃@(Tj) SOT-23-3L MOSFETs ROHS", LCSC Part Number=C699316, Manufacturer="Yangzhou Yangjie Elec Tech", Package=SOT-23-3L, ComponentLink1Description=LCSC, ComponentLink1URL=https://lcsc.com/product-detail/MOSFETs_Yangzhou-Yangjie-Elec-Tech-YJL2302B_C699316.html, Item Type=Mosfet, Manufacturer Part Number=YJL2302B
R1 R2 R10: library part CRGH0603J10K, "RES SMD 10K OHM 5% 1/5W 0603", Case Code (Imperial)=0603, Case Code (Metric)=1608, LCSC Part Number=C2092011, Manufacturer="TE Connectivity Holsworthy", Max Operating Temperature=125°C, Min Operating Temperature=-55°C, Number of Resistors=1, Power Rating=200mW, Resistance=10kR, Resistance Tolerance=5%, Resistor Type="Thick Film,Power resistor", Supplier Part Number 1=A126394DKR-ND, Temperature Coefficient=100ppm/°C, Voltage Rating=50V, Case/Package=0603, ComponentLink1Description=http://www.farnell.com/datasheets/2167052.pdf?src-supplier=Element14, ComponentLink1URL=http://www.farnell.com/datasheets/2167052.pdf?src-supplier=Element14, ComponentLink2Description=https://www.rohm.com/datasheet/ESR01MZPF/esr-e?src-supplier=Digi-Key, ComponentLink2URL=https://www.rohm.com/datasheet/ESR01MZPF/esr-e?src-supplier=Digi-Key, ComponentLink3Description=http://www.farnell.com/datasheets/2007183.pdf?src-supplier=Element14, ComponentLink3URL=http://www.farnell.com/datasheets/2007183.pdf?src-supplier=Element14, Depth=0.8mm, ELV=Compliant, Height=0.45mm, Length=1.6mm, Manufacturer Part Number=CRGH0603J10K, Mount="Surface Mount", Number of Terminations=2, Packaging="Tape and Reel", Pricing 1="1=0.1, 10=0.049, 100=0.02, 1000=0.00899, 2500=0.0078 (USD)", REACH SVHC="No SVHC", RoHS Compliant=Yes, Series=CRGH, Stock 1=85818, Supplier 1=Digi-Key, Technology="THICK FILM", Termination=Solder, Tolerance=5%, Voltage Rating (DC)=50V, Width=0.8mm
R3 R4: library part RC0603JR-07330RL, "RES  SMD 330R 100 mW 0603", Case Code (Imperial)=0603, Case Code (Metric)=1608, LCSC Part Number=C105879, Manufacturer=Yageo, Max Operating Temperature=155°C, Max Power Dissipation=100mW, Min Operating Temperature=-55°C, Package Quantity=5000, Resistance Tolerance=5%, Resistor Type="Thick Film", Supplier Part Number 1=311-330GRCT-ND, Temperature Coefficient=100ppm/°C, Voltage Rating=50V, Case/Package=0603, Category="Chip SMD Resistors", Construction=Rectangular, Depth=0.8mm, Features="Moisture Resistant", Height=0.45mm, Lead Free="Lead Free", Length=1.6mm, Manufacturer Part Number=RC0603JR-07330RL, Military Standard=Not, Number of Pins=2, Number of Terminations=2, Packaging="Tape and Reel", Power Rating=100mW, Pricing 1="1=0.10000, 10=0.02000, 100=0.00800, 1000=0.00360, 2500=0.00312 (USD)", REACH SVHC="No SVHC", Resistance=330R, RoHS=Yes, RoHS Compliant=Yes, Series=RC, Size Code=0603, Stock 1=1074593, Supplier 1=Digi-Key, Termination=SMD/SMT, Tolerance=5%, Voltage Rating (DC)=50V, Width=0.8mm
R5 R6 R7 R8: library part FRC1210F27R0TS, "500mW Thick Film Resistors 200V ±100ppm/℃ 27Ω 1210 Chip Resistor - SMD ROHS", LCSC Part Number=C2960734, Manufacturer=FOJAN, Package=1210, ComponentLink1Description=LCSC, ComponentLink1URL=https://www.lcsc.com/product-detail/Chip-span-style-background-color-ff0-Resistor-span-Surface-Mount_FOJAN-FRC1210F27R0TS_C2960734.html, Item Type=Resistor, Manufacturer Part Number=FRC1210F27R0TS
R9 R11: library part RC0603FR-07100RL, "RES SMD 100 OHM 1% 1/10W 0603", Case Code (Imperial)=0603, Case Code (Metric)=1608, LCSC Part Number=C105588, Manufacturer=Yageo, Max Operating Temperature=155°C, Max Power Dissipation=100mW, Min Operating Temperature=-55°C, Resistance Tolerance=1%, Resistor Type="Thick Film", Temperature Coefficient=100ppm/°C, Voltage Rating=50V, Case/Package=0603, Category="Chip SMD Resistors", Construction=Rectangular, Depth=0.8mm, Features="Moisture Resistant", Height=0.45mm, Lead Free="Lead Free", Length=1.6mm, Manufacturer Part Number=RC0603FR-07100RL, Military Standard=Not, Number of Pins=2, Number of Terminations=2, Packaging="Tape and Reel", Power Rating=100mW, Pricing 1="5000=0.00300, 5000=0.00200, 5000=0.00450, 50000=0.00410, 500000=0.00230, 2500000=0.00140 (USD)", REACH SVHC=Unknown, Resistance=100R, RoHS=Yes, RoHS Compliant=Yes, Series=RC, Size Code=0603, Stock 1=3800000, Supplier 1="Arrow Electronics", Supplier Part Number 1=RC0603FR-07100RL, Technology="THICK FILM", Termination=SMD/SMT, Tolerance=1%, Voltage Rating (DC)=50V, Width=0.8mm
R12 R13: library part ERJ-PA2F5101X, "RES SMD 5.1 KOHM 1% 1/5W 0402", Manufacturer=Panasonic, Supplier Part Number 1=P124488DKR-ND, Manufacturer Part Number=ERJ-PA2F5101X, Pricing 1="1=0.22, 10=0.183, 100=0.0717, 1000=0.03002, 2500=0.02751, 5000=0.02501 (USD)", Stock 1=5235, Supplier 1=Digi-Key
R14: library part RC0603FR-071ML, "RES SMD 1M OHM 1% 1/10W 0603", Case Code (Imperial)=0603, Case Code (Metric)=1608, LCSC Part Number=C105578, Manufacturer=Yageo, Max Operating Temperature=155°C, Min Operating Temperature=-55°C, Package Quantity=5000, Power Rating=100mW, Resistance=1MR, Supplier Part Number 1=311-1.00MHRDKR-ND, Temperature Coefficient=100ppm/°C, Tolerance=1%, Voltage Rating=50V, Case/Package=0603, ComponentLink1Description=http://www.farnell.com/datasheets/2167052.pdf?src-supplier=Mouser, ComponentLink1URL=http://www.farnell.com/datasheets/2167052.pdf?src-supplier=Mouser, ComponentLink2Description=http://www.farnell.com/datasheets/2167052.pdf?src-supplier=Element14, ComponentLink2URL=http://www.farnell.com/datasheets/2167052.pdf?src-supplier=Element14, ComponentLink3Description=http://documents.rs-components.com/techlib://itc_doclist_GB.htm?stockno=5048956&src-supplier=RSComponents, ComponentLink3URL=http://documents.rs-components.com/techlib://itc_doclist_GB.htm?stockno=5048956&src-supplier=RSComponents, Composition="Thick Film", Depth=0.8mm, Height=0.45mm, Lead Free="Lead Free", Length=1.6mm, Manufacturer Part Number=RC0603FR-071ML, Military Standard=Not, Number of Pins=2, Packaging="Tape and Reel", Pricing 1="1=0.1, 10=0.023, 100=0.0094, 1000=0.00421, 2500=0.00366 (USD)", REACH SVHC="No SVHC", Stock 1=3824601, Supplier 1=Digi-Key, Termination=SMD/SMT, Voltage Rating (DC)=50V, Width=0.8mm
SW1: "3.5mm 3.5mm SMDSplicing Black Rectangle button 50mA Surface Mount 7mm SPST 100MΩ 20000 12V 250gf@±50gf SMD Tactile Switches ROHS", LCSC Part Number=C2910695, Manufacturer=YIYUAN, Package=Custom, ComponentLink1Description=LCSC, ComponentLink1URL=https://lcsc.com/product-detail/Tactile-Switches_YIYUAN-YTS-B003-2A_C2910695.html, Item Type=Switch, Manufacturer Part Number=YTS-B003-2A
U1: "SMD MODULE, ESP32-S3, 4 MB SPI F", LCSC Part Number=C2913197, Manufacturer="Espressif Systems", Supplier Part Number 1=356-ESP32-S3WROOM1N4, Category=Uncategorized, ComponentLink1Description=LCSC, ComponentLink1URL=https://lcsc.com/product-detail/WiFi-Modules_Espressif-Systems-ESP32-S3-WROOM-1-N4_C2913197.html, Item Type=Module, Manufacturer Part Number=ESP32-S3-WROOM-1-N4, Pricing 1="1=3.15000, 10=3.15000, 50=3.15000, 100=3.15000, 1000=3.15000, 10000=3.15000 (USD)", RoHS=No, Stock 1=2246, Supplier 1=Mouser
U2: "IRM-H6 Series External Dimensions 5 x 7 x 4 mm SMT Infrared Receiver", LCSC Part Number=C91447, Manufacturer=Everlight, Max Operating Temperature=85°C, Min Operating Temperature=-25°C, Operating Supply Current=1.2mA, Operating Supply Voltage=5.5V, Package Quantity=2000, Supplier Part Number 1=5043152, Category="Optical Sensors", ComponentLink1Description=https://datasheet.ciiva.com/12418/irm-h638t-tr2-41100-12418542.pdf?src-supplier=Mouser, ComponentLink1URL=https://datasheet.ciiva.com/12418/irm-h638t-tr2-41100-12418542.pdf?src-supplier=Mouser, Item Type=IC, Lead Free="Lead Free", Manufacturer Part Number=IRM-H638T/TR2, Mount="Surface Mount", Number of Pins=4, Orientation="Top View", Packaging="Tape and Reel", Pricing 1="1000=0.53500, 2000=0.52000, 3000=0.51500, 4000=0.51000, 5000=0.49500 (USD)", RoHS=Yes, RoHS Compliant=Yes, Sensing Distance=8m, Supplier 1="Future Electronics"
U3: "SENSOR REMOTE REC 38.0KHZ 14M", Case/Package=Module, LCSC Part Number=C16216, Manufacturer=Everlight, Max Operating Temperature=80°C, Min Operating Temperature=-25°C, Min Output Voltage=2.7V, Operating Supply Current=1mA, Operating Supply Voltage=5.5V, Package Quantity=250, Supplier Part Number 1=2052908, Category="Optical Sensors", ComponentLink1Description=https://datasheet.ciiva.com/12418/irm-3636t-27149-12418050.pdf?src-supplier=Mouser, ComponentLink1URL=https://datasheet.ciiva.com/12418/irm-3636t-27149-12418050.pdf?src-supplier=Mouser, ComponentLink2Description=https://datasheet.ciiva.com/2821/irm-36xxt-series-2821351.pdf?src-supplier=Digi-Key, ComponentLink2URL=https://datasheet.ciiva.com/2821/irm-36xxt-series-2821351.pdf?src-supplier=Digi-Key, Item Type=IC, Manufacturer Part Number=IRM-3638T, Mount="Through Hole", Number of Pins=3, Orientation="Side View", Pricing 1="250=0.20500, 1500=0.19700, 5000=0.19000, 10000=0.18600, 20000=0.18000 (USD)", RoHS=Yes, RoHS Compliant=Yes, Sensing Distance=14m, Series=-, Supplier 1="Future Electronics"
U4: "600mA 60dB 500mV@(600mA) Fixed 3.3V~3.3V Positive 1 7V SOT-89(SOT-89-3) Linear Voltage Regulators (LDO) ROHS", LCSC Part Number=C171498, Manufacturer="UTC(Unisonic Tech)", Package=SOT-89(SOT-89-3), ComponentLink1Description=LCSC, ComponentLink1URL=https://lcsc.com/product-detail/Linear-Voltage-Regulators-LDO_UTC-Unisonic-Tech-LR1107G-33-AB3-C-R_C171498.html, Item Type=IC, Manufacturer Part Number=LR1107G-33-AB3-C-R

## Free pads (board coordinates)
  round 0 hole 45.67 unplated: 36(49.21,934.2) 36(1844.49,-140.6)
  round 0 hole 86.61 unplated: 36(295.28,146.8) 36(1273.62,1142.87)

## Via types
v1: diameter 23.62, hole 11.81, Top Layer to Bottom Layer, tented both sides, 59 vias

## Nets (pads, with @x,y where several pads share a name; then routed paths per layer and width w, separated by ;. In a path a pad name is that pad's centre, name@x,y a point inside that pad or via, vN(x,y) a via of type N, cw(c..) or ccw(c..) an arc to the next point about the centre after c; other vN are vias at no path point)
3V3: C1.1 C2.1 C9.1 J2.1 R1.2 R2.2 R11.2 U1.2 U2.4 U3.3 U4.3 | length 578.3
  Top Layer w10: U1.2@1854.5,950.11 U1.2
  Top Layer w15: v1(1574.8,-56.57) J2.1 ; C1.1 1812,1026.79 1820.79,1018 C2.1 U1.2@1854.5,950.11
  Top Layer w25: R2.2 252,339 v1(252,367) ; v1(595,198) C9.1 U4.3@595.03,329.39 ; U2.4 v1(685,1064) ; R11.2 v1(810,1253.83) ; v1(1578,1093) 1614,1093 R1.2 ; v1(1769,1085) C1.1
5V: C5.1 C6.1 C8.1 F1.2 LED3.1 LED5.1 LED7.1 LED9.1 P2.1 U4.2 | length 3472
  Top Layer w10: U4.2@535.41,418 U4.2@536,418.59
  Top Layer w15: C5.1@704.7,-1 C5.1 ; C6.1@1357.08,1298.38 C6.1
  Top Layer w25: F1.2 422.46,456.54 461,418 U4.2@535.41,418 ; U4.2@536,382 536,329.41 C8.1 536,179 456.38,99.38 LED9.1 581.32,24.68 607,-1 C5.1@704.7,-1 ; U4.2@536,418.59 950.33,418.59 LED3.1 ; LED5.1 C6.1@1357.08,1298.38 ; C6.1 1357.7,1350.7 1411,1404 1705.8,1404 LED7.1
  Bottom Layer w25: LED3.1 1122.91,364.91 1725,967 1725,1282.67 LED7.1 ; LED5.1 1203.74,1300.54 1203.74,1341.74 P2.1
EN_: C3.2 J2.6 R1.1 U1.3 | length 1603.9
  Top Layer w15: v1@1377.98,-56.98 J2.6 ; C3.2 1764,1032 1804.61,991.39 U1.3@1804.61,959
  Top Layer w20: v1(1461,456) 1461,764 1521.18,824.18 1766.08,824.18 1804.61,862.71 U1.3 U1.3@1804.61,959
  Bottom Layer w15: v1(1378,-57) 1378,412 1422,456 v1(1461,456)
GND: C1.2 C2.2 C3.1 C4.1 C5.2 C6.2 C7.1 C8.2 C9.2 C10.2 C11.2 C12.2 D1.1 J1.A1/B12 J1.B1/A12 J2.2 LED1.2 LED2.2 Q1.2 R10.1 R12.1 R13.1 R14.1 SW1.2 U1.1 U1.40 U1.41 U2.1 U2.2 U3.2 U4.1 | length 1795.9
  Top Layer w15: C8.2 C8.2@476.47,255.47 ; U4.1@476.47,328.94 U4.1 ; v1(1535.43,-56.57) J2.2
  Top Layer w20: SW1.2 v1(120.08,322.99) ; J1.B1/A12 v1(280.52,512.75) ; J1.A1/B12 v1(296.28,764.72) 297,765.43 297,829.5 247,879.5 R14.1 ; C4.1 v1(281.8,285) ; C11.2 v1(457.3,600.5) ; D1.1 v1(546.39,745.23) ; v1(917.95,-46.65) C5.2@917.95,-2.35 ; C5.2@918.65,-1.65 v1(918.65,42.65) ; v1(1513.7,664.57) U1.41 ; v1(1570.3,1254.7) C6.2 1571,1299.7 v1(1571,1344) ; v1(1583,1032) C3.1 ; v1(1604.61,573.66) U1.41 ; v1(1604.61,755.47) U1.41 ; v1(1695.51,664.57) U1.41 ; U1.40 v1(1904.61,305.32) ; v1(1904.61,905.7) U1.1
  Top Layer w25: C10.2 267.73,963.93 407.76,963.93 U2.2 U2.1 471.78,1064 U3.2 ; v1(440.17,255.47) 475.53,255.47 C8.2 ; v1(476.47,219.17) C8.2@476.47,254.53 ; C8.2@476.47,255.47 U4.1@476.47,328.94 ; C9.2 v1(710.35,244) ; LED2.2 LED1.2@1515.7,155.3 ; LED1.2 LED1.2@1515.7,155.3 ; v1(1546,155) 1516,155 LED1.2@1515.7,155.3 ; C1.2@1891.5,1084.5 C1.2
  other v1: 1904.61,375.62 366,786.8 414,786.8 1904.61,837.4 371.53,964 407.83,1027.7 695.33,1241.3 638,1242.3
IO4_: J2.5 U1.4 | length 1341.1
  Top Layer w15: v1@1417.35,-56.98 J2.5
  Top Layer w20: v1(1418,369) 1418,766 1510,858 1730.61,858 1754.61,882 U1.4
  Bottom Layer w15: v1(1417.37,-57) v1@1417.37,368.37
IO8_: P4.1 U1.12 U2.3 U3.1 | length 1201
  Top Layer w10: U3.1 578,1057.78 578,1008 613.22,972.78 627.39,972.78 U2.3 837,964 894,1021 1337,1021 1354.61,1003.39 U1.12
  Bottom Layer w20: P4.1 389,1145 421.06,1112.94 U3.1
IO18_: P3.1 R9.2 R10.2 U1.11 | length 809.8
  Top Layer w12: R9.2 753,1144.67 753,1101 771,1083 v1(792,1083) ; U1.11 U1.11@1404.8,950.2 ; v1@1404.8,1036.8 v1(1405,1037)
  Top Layer w20: U1.11@1404.8,950.2 v1@1404.8,1036.8
  Bottom Layer w20: v1(792,1083) 1106,1083 1152,1037 v1(1405,1037)
IO37_: R4.2 U1.30 | length 256.3
  Top Layer w12: R4.2 1368.03,98.97 1344.03,98.97 1328,115 1328,192 1348,212 1397.58,212 1404.61,219.03 U1.30
IO38_: R3.2 U1.31 | length 175.2
  Top Layer w12: R3.2 1370,184.97 1377.03,192 1437,192 1454.61,209.61 U1.31
IO42_: C4.2 R2.1 SW1.1 U1.35 | length 2216.3
  Top Layer w20: v1(1654.61,190.65) U1.35
  Top Layer w25: SW1.1 v1(168.34,113.34) 192,137 192,314
  Bottom Layer w25: v1(168.34,113.34) 234.68,47 337,47 519,-135 1607,-135 1655,-87 1655,190.26 v1(1654.61,190.65)
NetC7_2: C7.2 R11.1 | length 392.3
  Top Layer w20: v1(588,1158) 600,1146 C7.2 ; R11.1 848,1145 v1(860,1133)
  Bottom Layer w20: v1(588,1158) 835,1158 v1(860,1133)
NetJ1_A5: J1.A5 R12.2 | length 140.4
  Top Layer w10: J1.A5 306.95,687.94 332.5,713.5 R12.2
NetJ1_B5: J1.B5 R13.2 | length 178.9
  Top Layer w10: J1.B5 304.83,569.83 324,589 324,625 336.5,637.5 R13.2
NetLED1_1: LED1.1 R3.1 | length 48.3
  Top Layer w20: R3.1 LED1.1
NetLED2_1: LED2.1 R4.1 | length 48.3
  Top Layer w20: R4.1 LED2.1
NetLED3_2: LED3.2 LED4.1 | length 360.6
  Top Layer w25: LED3.2 LED4.1
NetLED4_2: LED4.2 R5.2 | length 372.6
  Top Layer w20: v1(831,1002) 831,1064 859,1092 R5.2
  Bottom Layer w20: v1(831,1002) 866.85,966.15 866.85,960.15 902,925 1003.46,925 LED4.2
NetLED5_2: LED5.2 LED6.1 | length 673.9
  Bottom Layer w25: LED6.1 588.35,1395 1063,1395 1101.57,1356.43 LED5.2
NetLED6_2: LED6.2 R6.2 | length 761.4
  Top Layer w20: 947,1434 985.95,1434 997.66,1422.28 R6.2@997.66,1353
  Top Layer w25: LED6.2 456.38,1391.38 499,1434 947,1434
NetLED7_2: LED7.2 LED8.1 | length 1238.3
  Bottom Layer w15: LED8.1 LED7.2
NetLED8_2: LED8.2 R7.2 | length 2047.2
  Top Layer w15: R7.2 999.66,1225 1744,1225 v1(1795,1174)
  Bottom Layer w15: LED8.2 1776.06,57.06 1795,76 v1(1795,1174)
NetLED9_2: LED9.2 LED10.1 | length 659.9
  Bottom Layer w25: LED9.2 578.06,-97 1064,-97 1101.57,-59.43 LED10.1
NetLED10_2: LED10.2 R8.2 | length 273.7
  Top Layer w25: R8.2 1155.66,142.34 1201.57,96.43 LED10.2
NetQ1_1: Q1.1 R9.1 | length 234.6
  Top Layer w10: Q1.1 678.23,1392 705,1392 721,1376 721,1288 753,1256 753,1205.33 R9.1
NetQ1_3: Q1.3 R5.1 R6.1 R7.1 R8.1 | length 1180.5
  Top Layer w12: R7.1 885.34,1228 923,1228 961,1190 961,1123 992,1092 R5.1
  Top Layer w20: R8.1 1054,322.02 1081,349.02 v1(1081,423)
  Top Layer w25: Q1.3 R6.1@880.34,1354
  Bottom Layer w20: v1(1081,423) v1(1081,1049)
RXD_: J2.4 U1.36 | length 827.6
  Top Layer w12: U1.36 U1.36@1705,260.63
  Top Layer w15: v1@1456.69,-56.95 J2.4 ; v1(1704,382) 1704.3,381.7 1704.3,261.33 U1.36
  Bottom Layer w15: v1(1456.72,-56.98) 1456.72,302.72 1536,382 v1(1704,382)
Shell_: C10.1 J1.S1 J1.S2 J1.S3 J1.S4 R14.2
TXD_: J2.3 U1.37 | length 770.9
  Top Layer w15: v1(1496.09,-56.98) J2.3 ; v1(1753.82,343) 1754.21,342.61 1754.21,261.42 U1.37
  Bottom Layer w15: v1(1496.09,-56.98) 1496.09,283.09 1556,343 v1(1753.82,343)
USB_DM: C12.1 D1.4 J1.A7 J1.B7 U1.13 | length 1502.8
  Top Layer w10: J1.A7 197.11,628.89 189,637 189,659 198.26,668.26 J1.B7 313.26,668.26 334,689 408,689 414,695 C12.1 447.5,713.5 508,774 606,774 633,747 D1.4 675.8,708.8 689,722 689,787 905,1003 1294,1003 1304.61,992.39 U1.13
USB_DP: C11.1 D1.3 J1.A6 J1.B6 U1.14 | length 1394.9
  Top Layer w10: J1.B6 275.33,609.2 283.44,617.32 v1(283.44,639.32) ; J1.A6 274.18,648.57 v1(283.44,639.32) ; U1.14 1207,950 1183,974 908,974 714.5,780.5 714.5,655.5 693,634 D1.3 633,609 625,601 494,601 457.5,637.5 C11.1 413,657 406,664 338,664 313.32,639.32 v1(283.44,639.32)
VUSB: D1.2 F1.1 J1.A4/B9 J1.B4/A9 | length 686.3
  Top Layer w10: J1.A4/B9 236.44,733 275,733 v1(294,714)
  Top Layer w15: J1.B4/A9 292.76,544.24 319,518 F1.1 354,519.54 v1(354,559) ; v1(451,682) 499,634 D1.2
  Bottom Layer w15: v1(354,559) 354,585 v1(451,682)
  Bottom Layer w20: v1(294,714) 419,714 v1(451,682)
pads on no net: J1.A8 J1.B8 J1.MH J2.MP1 J2.MP2 SW1.3 SW1.4 SW1.5 SW1.6 SW1.MH0 SW1.MH1 U1.5 U1.6 U1.7 U1.8 U1.9 U1.10 U1.15 U1.16 U1.17 U1.18 U1.19 U1.20 U1.21 U1.22 U1.23 U1.24 U1.25 U1.26 U1.27 U1.28 U1.29 U1.32 U1.33 U1.34 U1.38 U1.39

## Polygon pours and split planes (outlines as drawn)
GND on GND (split plane): 1938.56,-157.9 344.9,-157.9 344.9,-0.83 344.51,3.09 343.37,6.86 341.51,10.33 339.01,13.38 335.97,15.88 332.49,17.73 328.72,18.88 324.8,19.26 20.1,19.26 20.1,1012.53 324.8,1012.53 328.72,1012.92 332.49,1014.06 335.97,1015.92 339.01,1018.42 341.51,1021.46 343.37,1024.94 344.51,1028.71 344.9,1032.63 344.9,1435.76 1938.56,1435.76
3V3 on Power (split plane): 1938.56,-157.9 344.9,-157.9 344.9,-0.83 344.51,3.09 343.37,6.86 341.51,10.33 339.01,13.38 335.97,15.88 332.49,17.73 328.72,18.88 324.8,19.26 20.1,19.26 20.1,1012.53 324.8,1012.53 328.72,1012.92 332.49,1014.06 335.97,1015.92 339.01,1018.42 341.51,1021.46 343.37,1024.94 344.51,1028.71 344.9,1032.63 344.9,1435.76 1938.56,1435.76

## Other copper
Top Layer:
  rectangle net NetQ1_3: 1014,1033 1095,1145
  rectangle net GND: 656,1189 707,1337
  rectangle net GND: 279,752 389,778
  rectangle net NetQ1_3: 854,1164 911,1410
  rectangle net EN_: 1656,1012 1694,1113
  rectangle net GND: 1882,920 1931,1119
  rectangle net GND: 229,862.07 302.07,1003.07
  rectangle net Shell_: 135,790 205,1004
  rectangle net GND: 351,740 429,778
  rectangle net GND: 618.67,1189 714.67,1224
  rectangle net IO18_: 676,1128 772,1163
  rectangle net IO42_: 172,268 212,360
  rectangle net Shell_: 14,449 94,828.55
  rectangle net Shell_: 14,789.55 256,833
  rectangle net Shell_: 14,449 257,488
  rectangle net GND: 350,588 428,612

## Silkscreen, mask and mechanical layers (free items; w line width, h text height)
Top Overlay:
  text "*" at 346,1225.5 h45
  text "*" at 1706.3,1181.01 h45 r45
  text "*" at 1135,1132.5 h45
  text "*" at 984,705.5 h45
  text "*" at 984,514.5 h45
  text "*" at 1565.97,136.5 h45
  text "*" at 1198,98.5 h45
  text "*" at 571,82.5 h45
  text "*" at 1566,77.5 h45
  text "*" at 1725.3,73.01 h45 r45
Bottom Overlay:
  drawing of 3380 lines, arcs and shapes, not listed
  text "5V" at 1204,1343 h100
  text "IO8" at 621,1148 h100
  text "IO18" at 1362,1001.79 h100
  text "ZERO CARBON FOOTPRINT" at 963,381 h40
  text "Note:" at 1726,-75.82 h85
  text "* >> LED" at 1726,-153.65 h85
Board Outline:
  lines w10: 1844.49,-140.6 1958.66,-140.6 1958.66,-178 ; 1958.66,-178 324.8,-178 324.8,-0.83 0,-0.83 0,1032.63 324.8,1032.63 324.8,1455.86 1958.66,1455.86 1958.66,-178

## Dimensions
0,1032.63 to 0,-0.83 on Dimension
324.8,1455.86 to 0,1032.63 on Dimension
324.8,-178 to 0,-0.83 on Dimension
1958.66,1455.86 to 1958.66,-178 on Dimension
1958.66,1455.86 to 324.8,1455.86 on Dimension

## Text inside footprints (layer, text, board x,y; h text height)
J1: Top Overlay "Board Edge" at 52.55,768.72 h25 r270